# Altium PCB Auxiliary_Power_Board.pcbdoc
Units mm, origin at the board's own origin, x right, y up, seen from the top; angles counter-clockwise.
Board outline 100 x 100 mm, 2 copper layers (Top Layer, Bottom Layer); 26 components, 13 nets, 160 pads, 0 vias.
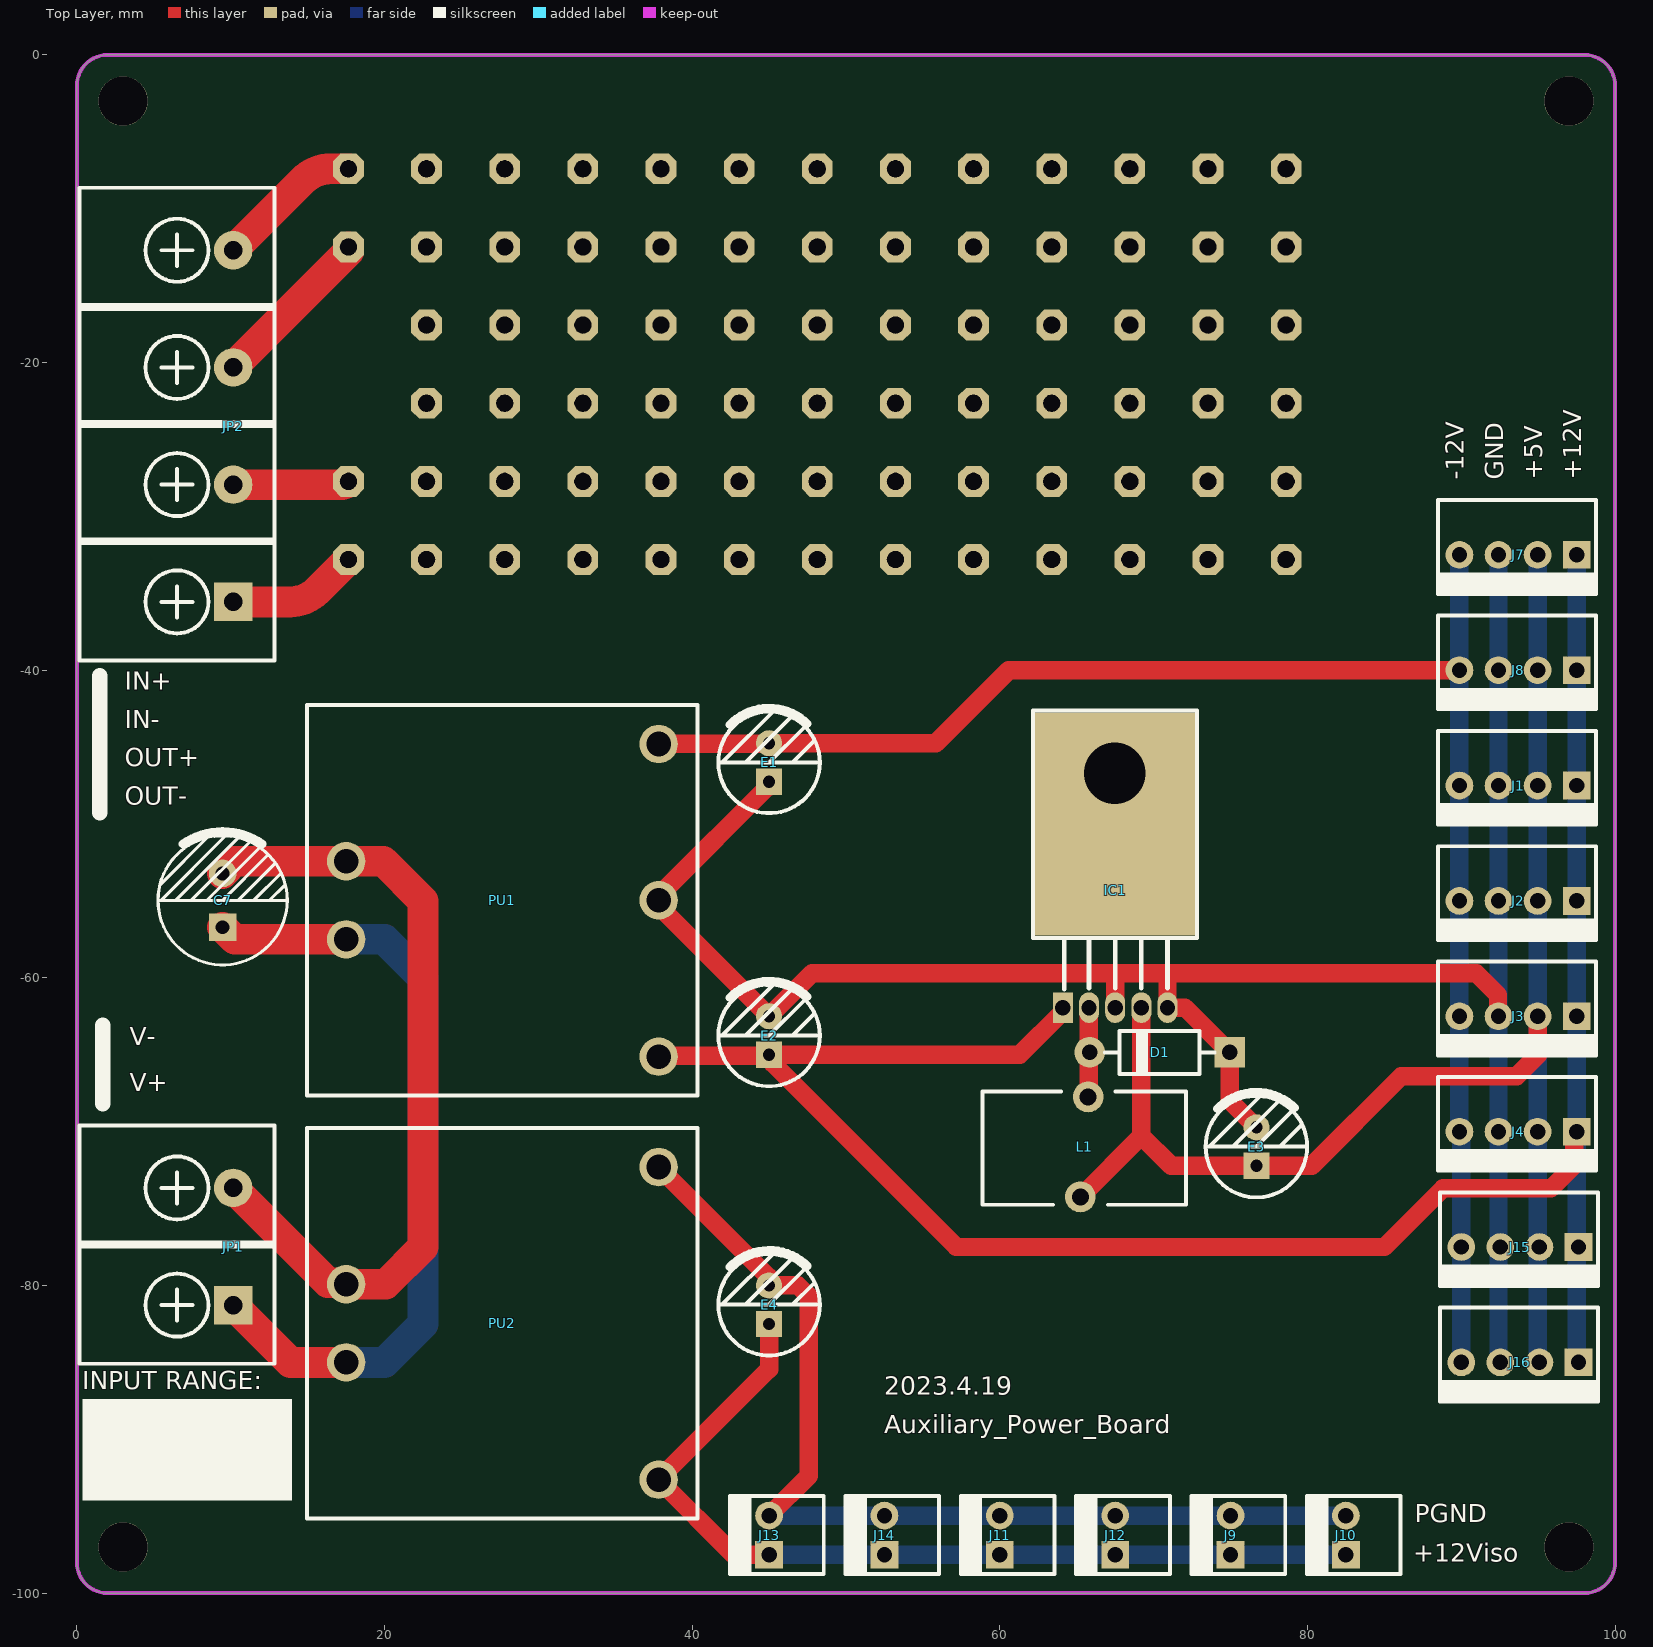
[diagram p0: Top Layer view]
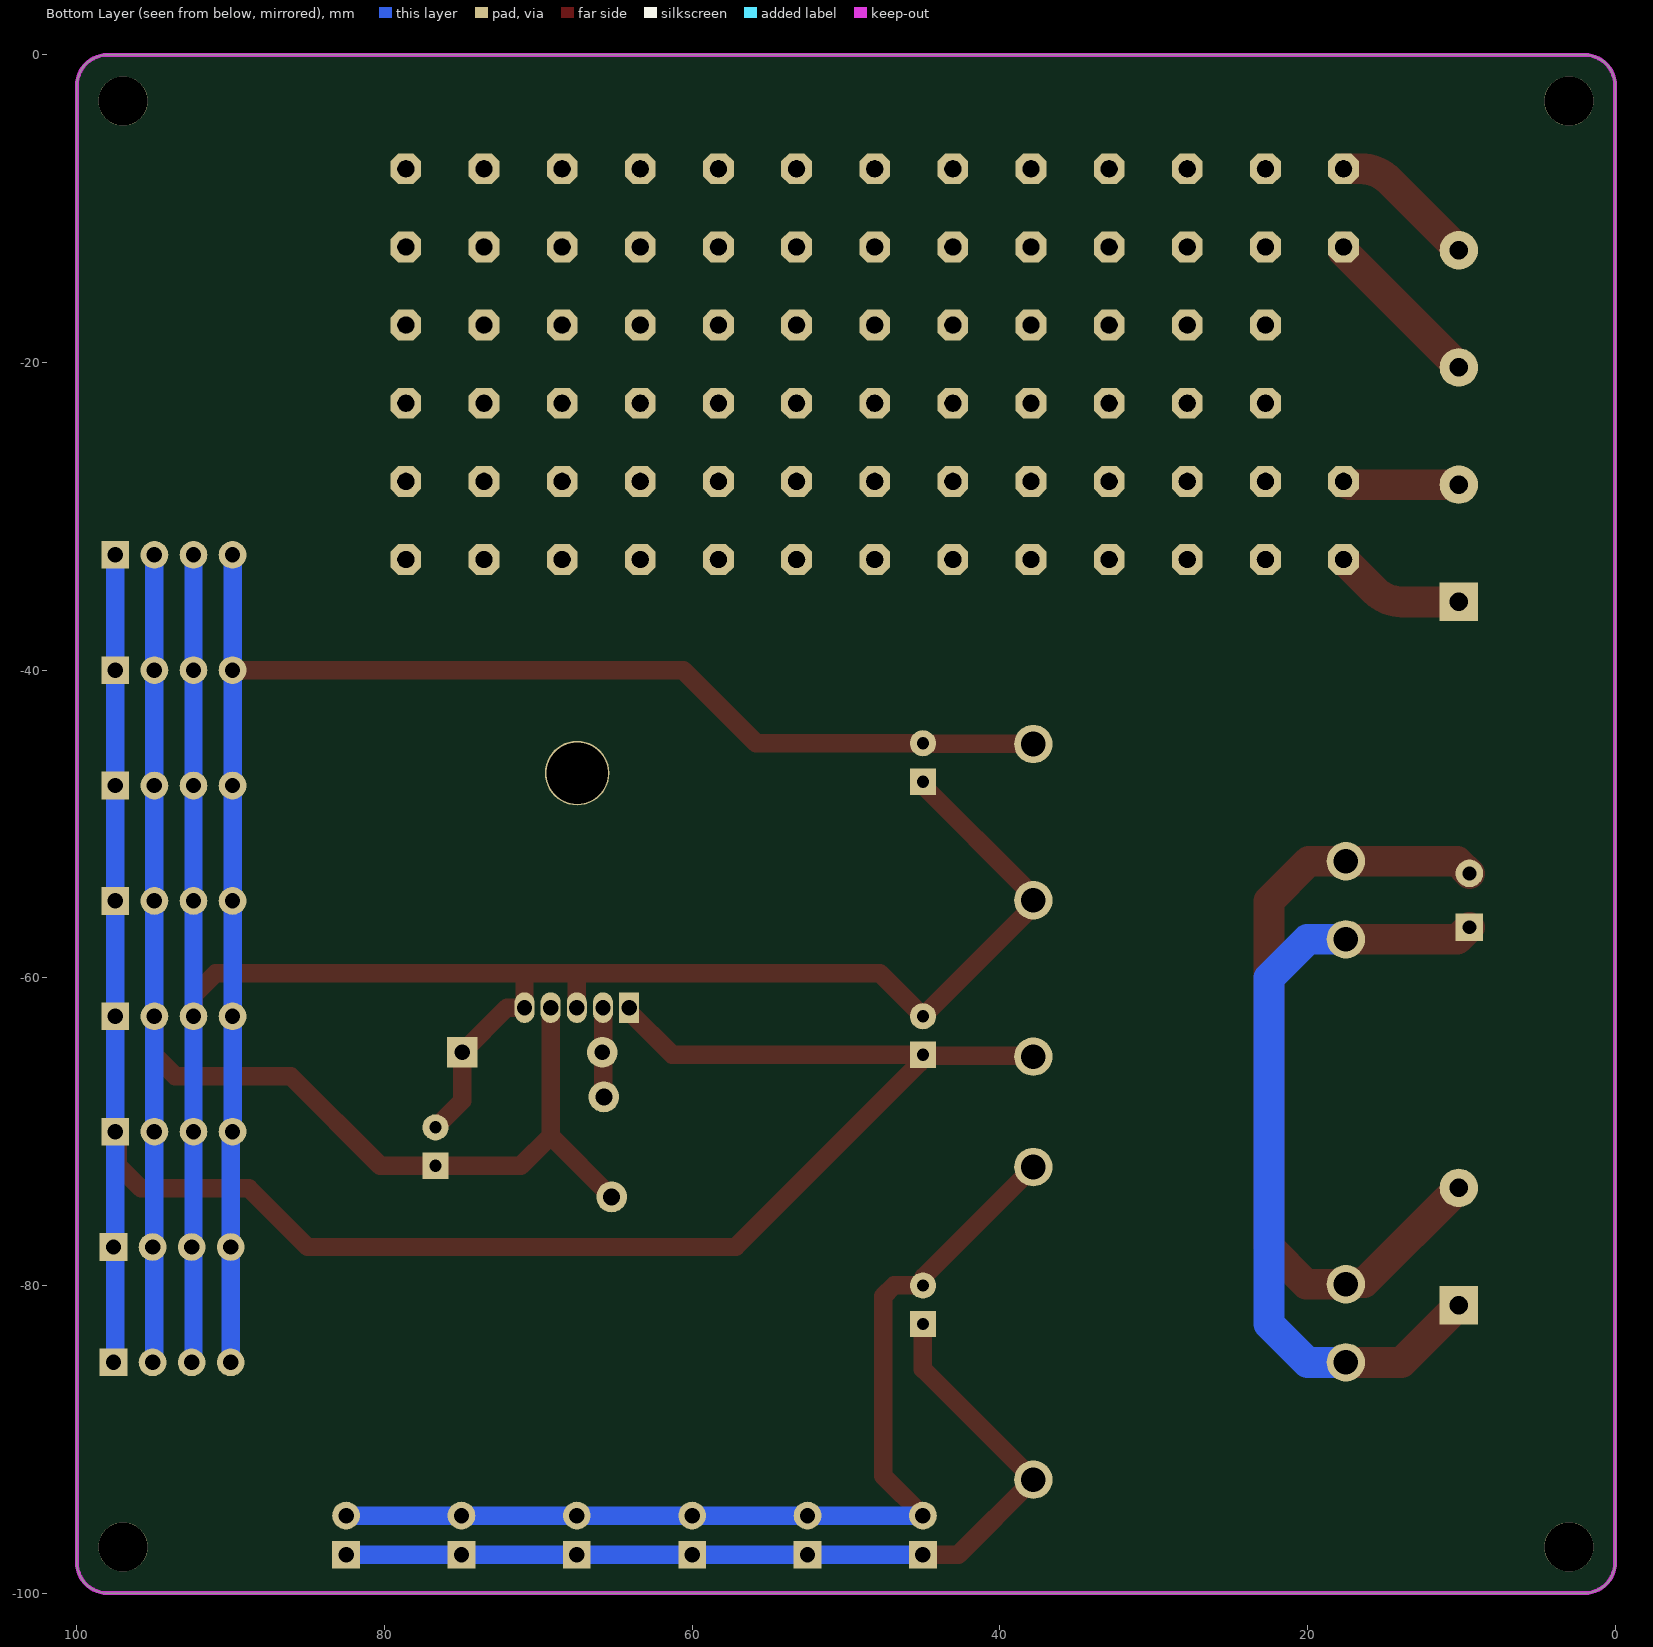
[diagram p1: Bottom Layer view, seen from below]

## Layer stack, top to bottom
Top Solder: solder mask 0.0102, Solder Resist, Dk 3.5
Top Layer: signal copper 0.0356
Dielectric1: dielectric 0.32, FR-4, Dk 4.8
Bottom Layer: signal copper 0.0356
Bottom Solder: solder mask 0.0102, Solder Resist, Dk 3.5

## Board outline
2,-100 cw(c2,-98) 0,-98 0,-2 cw(c2,-2) 2,0 98,0 cw(c98,-2) 100,-2 100,-98 cw(c98,-98) 98,-100

## Design rules (kind name [scope] priority, off if disabled: settings)
Clearance [All] p1: gap=0.254 ignorepadtopadclearanceinfootprint=FALSE except(0: Arc-Hole Track-Hole SMDPad-Hole THPad-Hole Via-Hole Fill-Hole Poly-Hole Region-Hole Text-Hole)
HoleSize [All] p1 off: absolutevalues=TRUE maxlimit=2.54 minlimit=0.025 maxpercent=80.000 minpercent=20.000
MinimumSolderMaskSliver [All] p1 off: minsoldermaskwidth=0.254
PolygonConnect [All] p1: connectstyle=Relief reliefconductorwidth=0.254 reliefentries=4 polygonreliefangle="90 Angle" airgapwidth=0.254
RoutingVias [All] p1: holewidth=0.711 width=1.27 viastyle="Through Hole" minholewidth=0.711 minwidth=1.27 maxholewidth=0.711 maxwidth=1.27
SilkToSolderMaskClearance [IsPad] p1 off: minsilkscreentomaskgap=0.254 clearancetoexposedcopper=TRUE
SolderMaskExpansion [All] p1: expansion=0.102 istentingtop=FALSE
Width [All] p1 off: maxlimit=0.254 minlimit=0.254 preferedwidth=0.254
27 further rules are at their usual default settings.

## Classes and differential pairs
component class Auxiliary_Power_Board: C7 D1 E1 E2 E3 E4 IC1 J1 J2 J3 J4 J8 J9 J10 J11 J12 J13 J14 JP1 JP2 L1 PU1

## Components (designator, comment, footprint, x,y, rotation, side; value= is the part's Value field where it differs from the comment)
C7 "47uF/100V" "CAP 3.5*8*11.5 - BK" 9.474,-54.96 r90 top
D1 "B5819WS" DO-41 70.391,-64.844 r180 top
E1 "470uF/16V" "CS 2.5*6.3*11 - V" 45,-46 r270 top
E2 "470uF/16V" "CS 2.5*6.3*11 - V" 45,-63.75 r270 top
E3 "470uF/16V" "CS 2.5*6.3*11 - V" 76.681,-70.972 r270 top
E4 "470uF/16V" "CS 2.5*6.3*11 - V" 45,-81.25 r270 top
IC1 "LM2596-5.0V" TO220-5C 67.5,-61.938 r0 top
J1 "HDR-1X4" KF2510-LI-4P 93.69,-47.5 r180 top
J2 "HDR-1X4" KF2510-LI-4P 93.69,-55 r180 top
J3 "HDR-1X4" KF2510-LI-4P 93.69,-62.5 r180 top
J4 "HDR-1X4" KF2510-LI-4P 93.69,-70 r180 top
J7 "HDR-1X4" KF2510-LI-4P 93.69,-32.5 r180 top
J8 "HDR-1X4" KF2510-LI-4P 93.69,-40 r180 top
J9 "HDR-1X2" KF2510-LI-2P 75,-96.23 r90 top
J10 "HDR-1X2" KF2510-LI-2P 82.5,-96.23 r90 top
J11 "HDR-1X2" KF2510-LI-2P 60,-96.23 r90 top
J12 "HDR-1X2" KF2510-LI-2P 67.5,-96.23 r90 top
J13 "HDR-1X2" KF2510-LI-2P 45,-96.23 r90 top
J14 "HDR-1X2" KF2510-LI-2P 52.5,-96.23 r90 top
J15 "HDR-1X4" KF2510-LI-4P 93.81,-77.5 r180 top (schematic designator J7)
J16 "HDR-1X4" KF2510-LI-4P 93.81,-85 r180 top (schematic designator J7)
JP1 "HDR-1X2" KF7620-2P 6.51,-77.47 r90 top
JP2 "HDR-1X4" KF7620-4P 6.51,-24.13 r90 top
L1 "100uH" LMR135 65.744,-70.992 r270 top
PU1 "MORSUN URA2412YMD" "1in 2out" 27.66,-54.96 r0 top
PU2 "MORSUN URB2412YMD" "1in 1out" 27.66,-82.46 r0 top

## Footprints (in the part's own frame and the unit in brackets; to place one, negate y for a bottom-side part, rotate by r counter-clockwise, add the part's x,y. Pads: shape width x height; smd on the part's side, far side on the other; paste and mask are expansions set on the pad)
"1in 1out" [mm] "MORNSUN sigle out without ctrl"
  round 2.5 hole 1.6: 1(-10.16,2.54) 2(-10.16,-2.54) 3(10.16,-10.16) 5(10.16,10.16)
  silkscreen extent -12.7,-12.7 12.7,12.7
"1in 2out" [mm] "MORNSUN dual out without ctrl"
  round 2.5 hole 1.6: 1(-10.16,2.54) 2(-10.16,-2.54) 3(10.16,-10.16) 4(10.16,0) 5(10.16,10.16)
  silkscreen extent -12.7,-12.7 12.7,12.7
"CAP 3.5*8*11.5 - BK" [mm] "脚距3.5mm直径8mm高度11.5mm"
  rect 1.8x1.8 hole 0.9: 1(-1.75,0)
  round 1.8 hole 0.9: 2(1.75,0)
  silkscreen extent -4.2,-4.2 4.5,4.2, body extent -4,-4 4.01,4, height 11.54
"CS 2.5*6.3*11 - V" [mm] "脚距2.5mm , 直径6.3mm , 高11mm"
  rect 1.7x1.7 hole 0.8: 1(1.25,0)
  round 1.7 hole 0.8: 2(-1.25,0)
  silkscreen extent -3.56,-3.3 3.3,3.3, body extent -3.15,-3.15 3.15,3.15, height 11.02
DO-41 [mm] "2.6*9.1mm(直径，脚距）"
  rect 2x2 hole 1: 1(-4.55,0)
  round 2 hole 1: 2(4.55,0)
  silkscreen extent -3.56,-1.4 3.56,1.4, body extent -4.92,-1.29 4.98,1.31, height 2.65
KF2510-LI-2P [mm] "接插件/2A"
  rect 1.8x1.8 hole 1: 1(-1.27,0)
  round 1.8 hole 1: 2(1.27,0)
  silkscreen extent -2.59,-3.56 2.54,2.54, body extent -2.54,-3.5 2.54,2.4, height 11.05
KF2510-LI-4P [mm] "接插件/2A"
  rect 1.8x1.8 hole 1: 1(-3.81,0)
  round 1.8 hole 1: 2(-1.27,0) 3(1.27,0) 4(3.81,0)
  silkscreen extent -5.08,-3.56 5.21,2.54, body extent -5.08,-3.5 5.08,2.4, height 11.05
KF7620-2P [mm] "15.2*12*12mm(长宽高)"
  rect 2.5x2.5 hole 1.2: 1(-3.81,-3.65)
  round 2.5 hole 1.2: 2(3.81,-3.65)
  silkscreen extent -7.62,-6.35 7.87,6.35, body extent -7.62,-6.2 8.32,6.2, height 12.45
KF7620-4P [mm] "30.5*12*12mm(长宽高)"
  rect 2.5x2.5 hole 1.2: 1(-11.43,-3.65)
  round 2.5 hole 1.2: 2(-3.81,-3.65) 3(3.81,-3.65) 4(11.43,-3.65)
  silkscreen extent -15.24,-6.35 15.49,6.35, body extent -15.24,-6.2 15.94,6.2, height 12.45
LMR135 [mm] "磁环电感，外径13mm，厚度5mm"
  round 2 hole 1.1: 1(-3.25,0) 2(3.25,-0.508)
  silkscreen extent -3.61,-6.86 3.76,6.35, body extent -3.45,-6.75 3.55,6.25, height 12.5
TO220-5C [mm] "220，5脚晶体管"
  round 4.2 hole 4: 0(-0.022,15.247)
  rect 10.5x14.5 smd: 0(0,11.938)
  rect 1.3x2 hole 1: 1(-3.4,0)
  oval 1.3x2 hole 1: 2(-1.7,0) 3(0,0) 4(1.7,0) 5(3.4,0)
  silkscreen extent -5.36,1.19 5.31,19.3, body extent -5.05,-0.22 5.05,18.1, height 4.5

## Part data
C7: library part CE, "直插电解电容", BOM名称=直插电解电容, 下单链接=https://item.taobao.com/item.htm?ft=t&id=613637044352, 淘宝ID=小糖豆的小窝窝
D1: library part 1N5819, "肖特基二极管", BOM名称=肖特基二极管, 下单链接=https://item.taobao.com/item.htm?ft=t&id=613637044352, 淘宝ID=小糖豆的小窝窝
E1 E2 E3 E4: library part CS, "直插固态电容", BOM名称=直插固态电容, 下单链接=https://item.taobao.com/item.htm?ft=t&id=613637044352, 淘宝ID=小糖豆的小窝窝
IC1: library part LM2596-5.0, "DC降压芯片", BOM名称=DC降压芯片, 下单链接=https://item.taobao.com/item.htm?ft=t&id=613637044352, 淘宝ID=小糖豆的小窝窝
J1 J2 J3 J4 J7 J8 J15 J16 JP2: library part "Header 4", "4P接插件", BOM名称=4P接插件, 下单链接=https://item.taobao.com/item.htm?ft=t&id=613637044352, 淘宝ID=小糖豆的小窝窝
J9 J10 J11 J12 J13 J14 JP1: library part "Header 2", "2P接插件", BOM名称=2P接插件, 下单链接=https://item.taobao.com/item.htm?ft=t&id=613637044352, 淘宝ID=小糖豆的小窝窝
L1: library part L-MR, "功率磁环电感", BOM名称=功率磁环电感, 下单链接=https://item.taobao.com/item.htm?ft=t&id=613637044352, 淘宝ID=小糖豆的小窝窝
PU1: library part "MORSUN 1in 2out"
PU2: library part "MORSUN 1in 1out"

## Free pads (board coordinates)
  round 3.2 hole 3.2 unplated: 1(3,-97) 1(3,-3) 1(97,-97) 1(97,-3)
  oct 2x2 hole 1.1: A34(17.654,-32.807) A34(17.654,-27.727) A34(17.654,-12.487) A34(17.654,-7.407) A34(22.734,-32.807) A34(22.734,-27.727) A34(22.734,-22.647) A34(22.734,-17.567) A34(22.734,-12.487) A34(22.734,-7.407) A34(27.814,-32.807) A34(27.814,-27.727) A34(27.814,-22.647) A34(27.814,-17.567) A34(27.814,-12.487) A34(27.814,-7.407) A34(32.894,-32.807) A34(32.894,-27.727) A34(32.894,-22.647) A34(32.894,-17.567) A34(32.894,-12.487) A34(32.894,-7.407) A34(37.974,-32.807) A34(37.974,-27.727) A34(37.974,-22.647) A34(37.974,-17.567) A34(37.974,-12.487) A34(37.974,-7.407) A34(43.054,-32.807) A34(43.054,-27.727) A34(43.054,-22.647) A34(43.054,-17.567) A34(43.054,-12.487) A34(43.054,-7.407) A34(48.134,-32.807) A34(48.134,-27.727) A34(48.134,-22.647) A34(48.134,-17.567) A34(48.134,-12.487) A34(48.134,-7.407) A34(53.214,-32.807) A34(53.214,-27.727) A34(53.214,-22.647) A34(53.214,-17.567) A34(53.214,-12.487) A34(53.214,-7.407) A34(58.294,-32.807) A34(58.294,-27.727) A34(58.294,-22.647) A34(58.294,-17.567) A34(58.294,-12.487) A34(58.294,-7.407) A34(63.374,-32.807) A34(63.374,-27.727) A34(63.374,-22.647) A34(63.374,-17.567) A34(63.374,-12.487) A34(63.374,-7.407) A34(68.454,-32.807) A34(68.454,-27.727) A34(68.454,-22.647) A34(68.454,-17.567) A34(68.454,-12.487) A34(68.454,-7.407) A34(73.534,-32.807) A34(73.534,-27.727) A34(73.534,-22.647) A34(73.534,-17.567) A34(73.534,-12.487) A34(73.534,-7.407) A34(78.614,-32.807) A34(78.614,-27.727) A34(78.614,-22.647) A34(78.614,-17.567) A34(78.614,-12.487) A34(78.614,-7.407)

## Nets (pads, with @x,y where several pads share a name; then routed paths per layer and width w, separated by ;. In a path a pad name is that pad's centre, name@x,y a point inside that pad or via, vN(x,y) a via of type N, cw(c..) or ccw(c..) an arc to the next point about the centre after c; other vN are vias at no path point)
1: JP2.1 pad.A34@17.654,-32.807 | length 8.5
  Top Layer w2: JP2.1 13.848,-35.56 ccw(c13.848,-33.02) 15.644,-34.816 pad.A34@17.654,-32.807
2: JP2.2 pad.A34@17.654,-27.727 | length 7.6
  Top Layer w2: JP2.2 17.138,-27.94 ccw(c17.138,-27.211) pad.A34@17.654,-27.727
3: JP2.3 pad.A34@17.654,-12.487 | length 10.9
  Top Layer w2: JP2.3@10.16,-20.288 17.654,-12.795 pad.A34@17.654,-12.487
4: JP2.4 pad.A34@17.654,-7.407 | length 9.6
  Top Layer w2: JP2.4 14.709,-8.151 cw(c16.506,-9.947) 16.506,-7.407 pad.A34@17.654,-7.407
+5: E3.1 IC1.4 J1.2 J2.2 J3.2 J4.2 J7.2 J8.2 J15.2 J16.2 L1.2 | length 98.7
  Top Layer w1.2: L1.2 69.2,-70.278 ; IC1.4 69.2,-70.278 ; J4.2@94.845,-70.115 J4.2 ; J3.2 94.96,-65.04 93.608,-66.392 86.108,-66.392 80.278,-72.222 E3.1 71.144,-72.222 69.2,-70.278
  Bottom Layer w1.2: J16.2@94.96,-85 J4.2 J3.2 J2.2 J1.2 J8.2 J7.2
+12: E2.1 IC1.1 J1.1 J2.1 J3.1 J4.1 J7.1 J8.1 J15.1 J16.1 PU1.3 | length 142.4
  Top Layer w1.2: PU1.3 37.88,-65.06 44.94,-65.06 E2.1 ; IC1.1 64.1,-62.188 61.288,-65 E2.1 ; J4.1 97.351,-70.149 97.351,-72.161 95.824,-73.688 88.812,-73.688 85,-77.5 57.18,-77.5 45.25,-65.57 45.25,-65.25 E2.1
  Bottom Layer w1.2: J16.1@97.5,-85 J4.1 J3.1 J2.1 J1.1 J8.1 J7.1
+12iso: E4.1 J9.1 J10.1 J11.1 J12.1 J13.1 J14.1 PU2.3 | length 59.8
  Top Layer w1.2: J13.1 42.7,-97.5 PU2.3 45,-85.44 E4.1
  Bottom Layer w1.2: J13.1 J14.1 J11.1 J12.1 J9.1 J10.1
-12: E1.2 J1.4 J2.4 J3.4 J4.4 J7.4 J8.4 J15.4 J16.4 PU1.5 | length 106.7
  Top Layer w1.2: PU1.5 37.845,-44.775 44.975,-44.775 E1.2 55.834,-44.75 60.584,-40 J8.4 J8.4@90,-40
  Bottom Layer w1.2: J7.4 J8.4 J1.4 J2.4 J3.4 89.88,-70.162 89.998,-70.28 J15.4@89.998,-77.498 ; J16.4 J15.4
GND: D1.1 E1.1 E2.2 E3.2 IC1.3 IC1.5 J1.3 J2.3 J3.3 J4.3 J7.3 J8.3 J15.3 J16.3 PU1.4 | length 139.3
  Top Layer w1.2: E1.1 44.9,-47.35 44.9,-47.6 38.32,-54.18 38.32,-54.189 38.171,-54.339 38.171,-55.581 38.32,-55.731 38.32,-55.82 E2.2 47.81,-59.69 67.5,-59.69 ; IC1.3 67.5,-59.69 ; E3.2 74.941,-67.981 D1.1 72.035,-61.938 IC1.5 70.9,-59.69 ; J3.3 92.386,-62.466 92.386,-61.116 90.961,-59.69 70.9,-59.69 ; 67.5,-59.69 70.9,-59.69
  Bottom Layer w1.2: J16.3@92.42,-85 J4.3 J3.3 J2.3 J1.3 J8.3 J7.3
NetC7_1: C7.1 JP1.1 PU1.2 PU2.2 | length 51.8
  Top Layer w2: C7.1 10.264,-57.5 PU1.2 ; JP1.1 13.88,-85 PU2.2
  Bottom Layer w2: PU2.2 20,-85 22.5,-82.5 22.5,-60 20,-57.5 PU1.2
NetC7_2: C7.2 JP1.2 PU1.1 PU2.1 | length 52.9
  Top Layer w2: C7.2 10.264,-52.42 PU1.1 19.92,-52.42 22.5,-55 22.5,-77.5 20.08,-79.92 PU2.1 17.404,-79.824 16.324,-79.824 JP1.2
NetD1_2: D1.2 IC1.2 L1.1 | length 5.8
  Top Layer w1.2: L1.1 65.772,-67.714 65.772,-61.966 IC1.2
PGND: E4.2 J9.2 J10.2 J11.2 J12.2 J13.2 J14.2 PU2.5 | length 66.4
  Top Layer w1.2: PU2.5 44.962,-79.442 44.962,-79.962 E4.2 46.871,-80 47.574,-80.703 47.574,-92.386 J13.2
  Bottom Layer w1.2: J13.2 J14.2 J11.2 J12.2 J9.2 J10.2
pads on no net: IC1.0

## Keep-outs
Keep-Out Layer:
  the board outline again, w0.254

## Silkscreen, mask and mechanical layers (free items; w line width, h text height)
Top Overlay:
  rectangle: 0.351,-93.98 14,-87.389
  lines w1.016: 1.476,-49.261 1.476,-40.369 ; 1.68,-68.183 1.68,-63.103
  text "-12V" at 90.535,-27.609 h2.03 r90
  text "GND" at 93.117,-27.62 h2.03 r90
  text "+5V" at 95.657,-27.62 h2.03 r90
  text "+12V" at 98.197,-27.62 h2.03 r90
  text "IN+" at 3.098,-41.649 h2.03
  text "IN-" at 3.098,-44.149 h2.03
  text "OUT+" at 3.098,-46.649 h2.03
  text "OUT-" at 3.098,-49.149 h2.03
  text "V-" at 3.434,-64.758 h2.03
  text "V+" at 3.434,-67.758 h2.03
  text "INPUT RANGE:" at 0.35,-87.149 h2.03
  text "2023.4.19" at 52.5,-87.5 h2.03
  text "Auxiliary_Power_Board" at 52.5,-90 h2.03
  text "PGND" at 86.964,-95.767 h2.03
  text "+12Viso" at 86.871,-98.344 h2.03
Top Solder:
  lines w1.2: 10.621,-44.379 13.907,-41.093 30.294,-41.093 34.387,-37 80.5,-37 84.336,-33.164 84.336,-15.664 92.5,-7.5 ; 30,-97 30,-41.421 ; 30,-69 30.256,-68.744 43.744,-68.744 55,-80 75,-80 91.098,-92.878
Bottom Solder:
  lines w1.2: 10.621,-44.379 13.907,-41.093 30.294,-41.093 34.387,-37 80.5,-37 84.336,-33.164 84.336,-15.664 92.5,-7.5 ; 30,-97 30,-41.421 ; 30,-69 30.256,-68.744 43.744,-68.744 55,-80 75,-80 91.098,-92.878
Mechanical 1:
  the board outline again, w0.2